# Altium PCB a4403-ELE_PCB.PcbDoc (part 3 of 5)
Units mm, origin at the board's own origin, x right, y up, seen from the top; angles counter-clockwise.
Board outline 160 x 110 mm, 4 copper layers (Top Layer, Int1 (GND), Int2 (PWR), Bottom Layer), stack 1.369 mm thick; 389 components, 298 nets, 1653 pads, 661 vias.
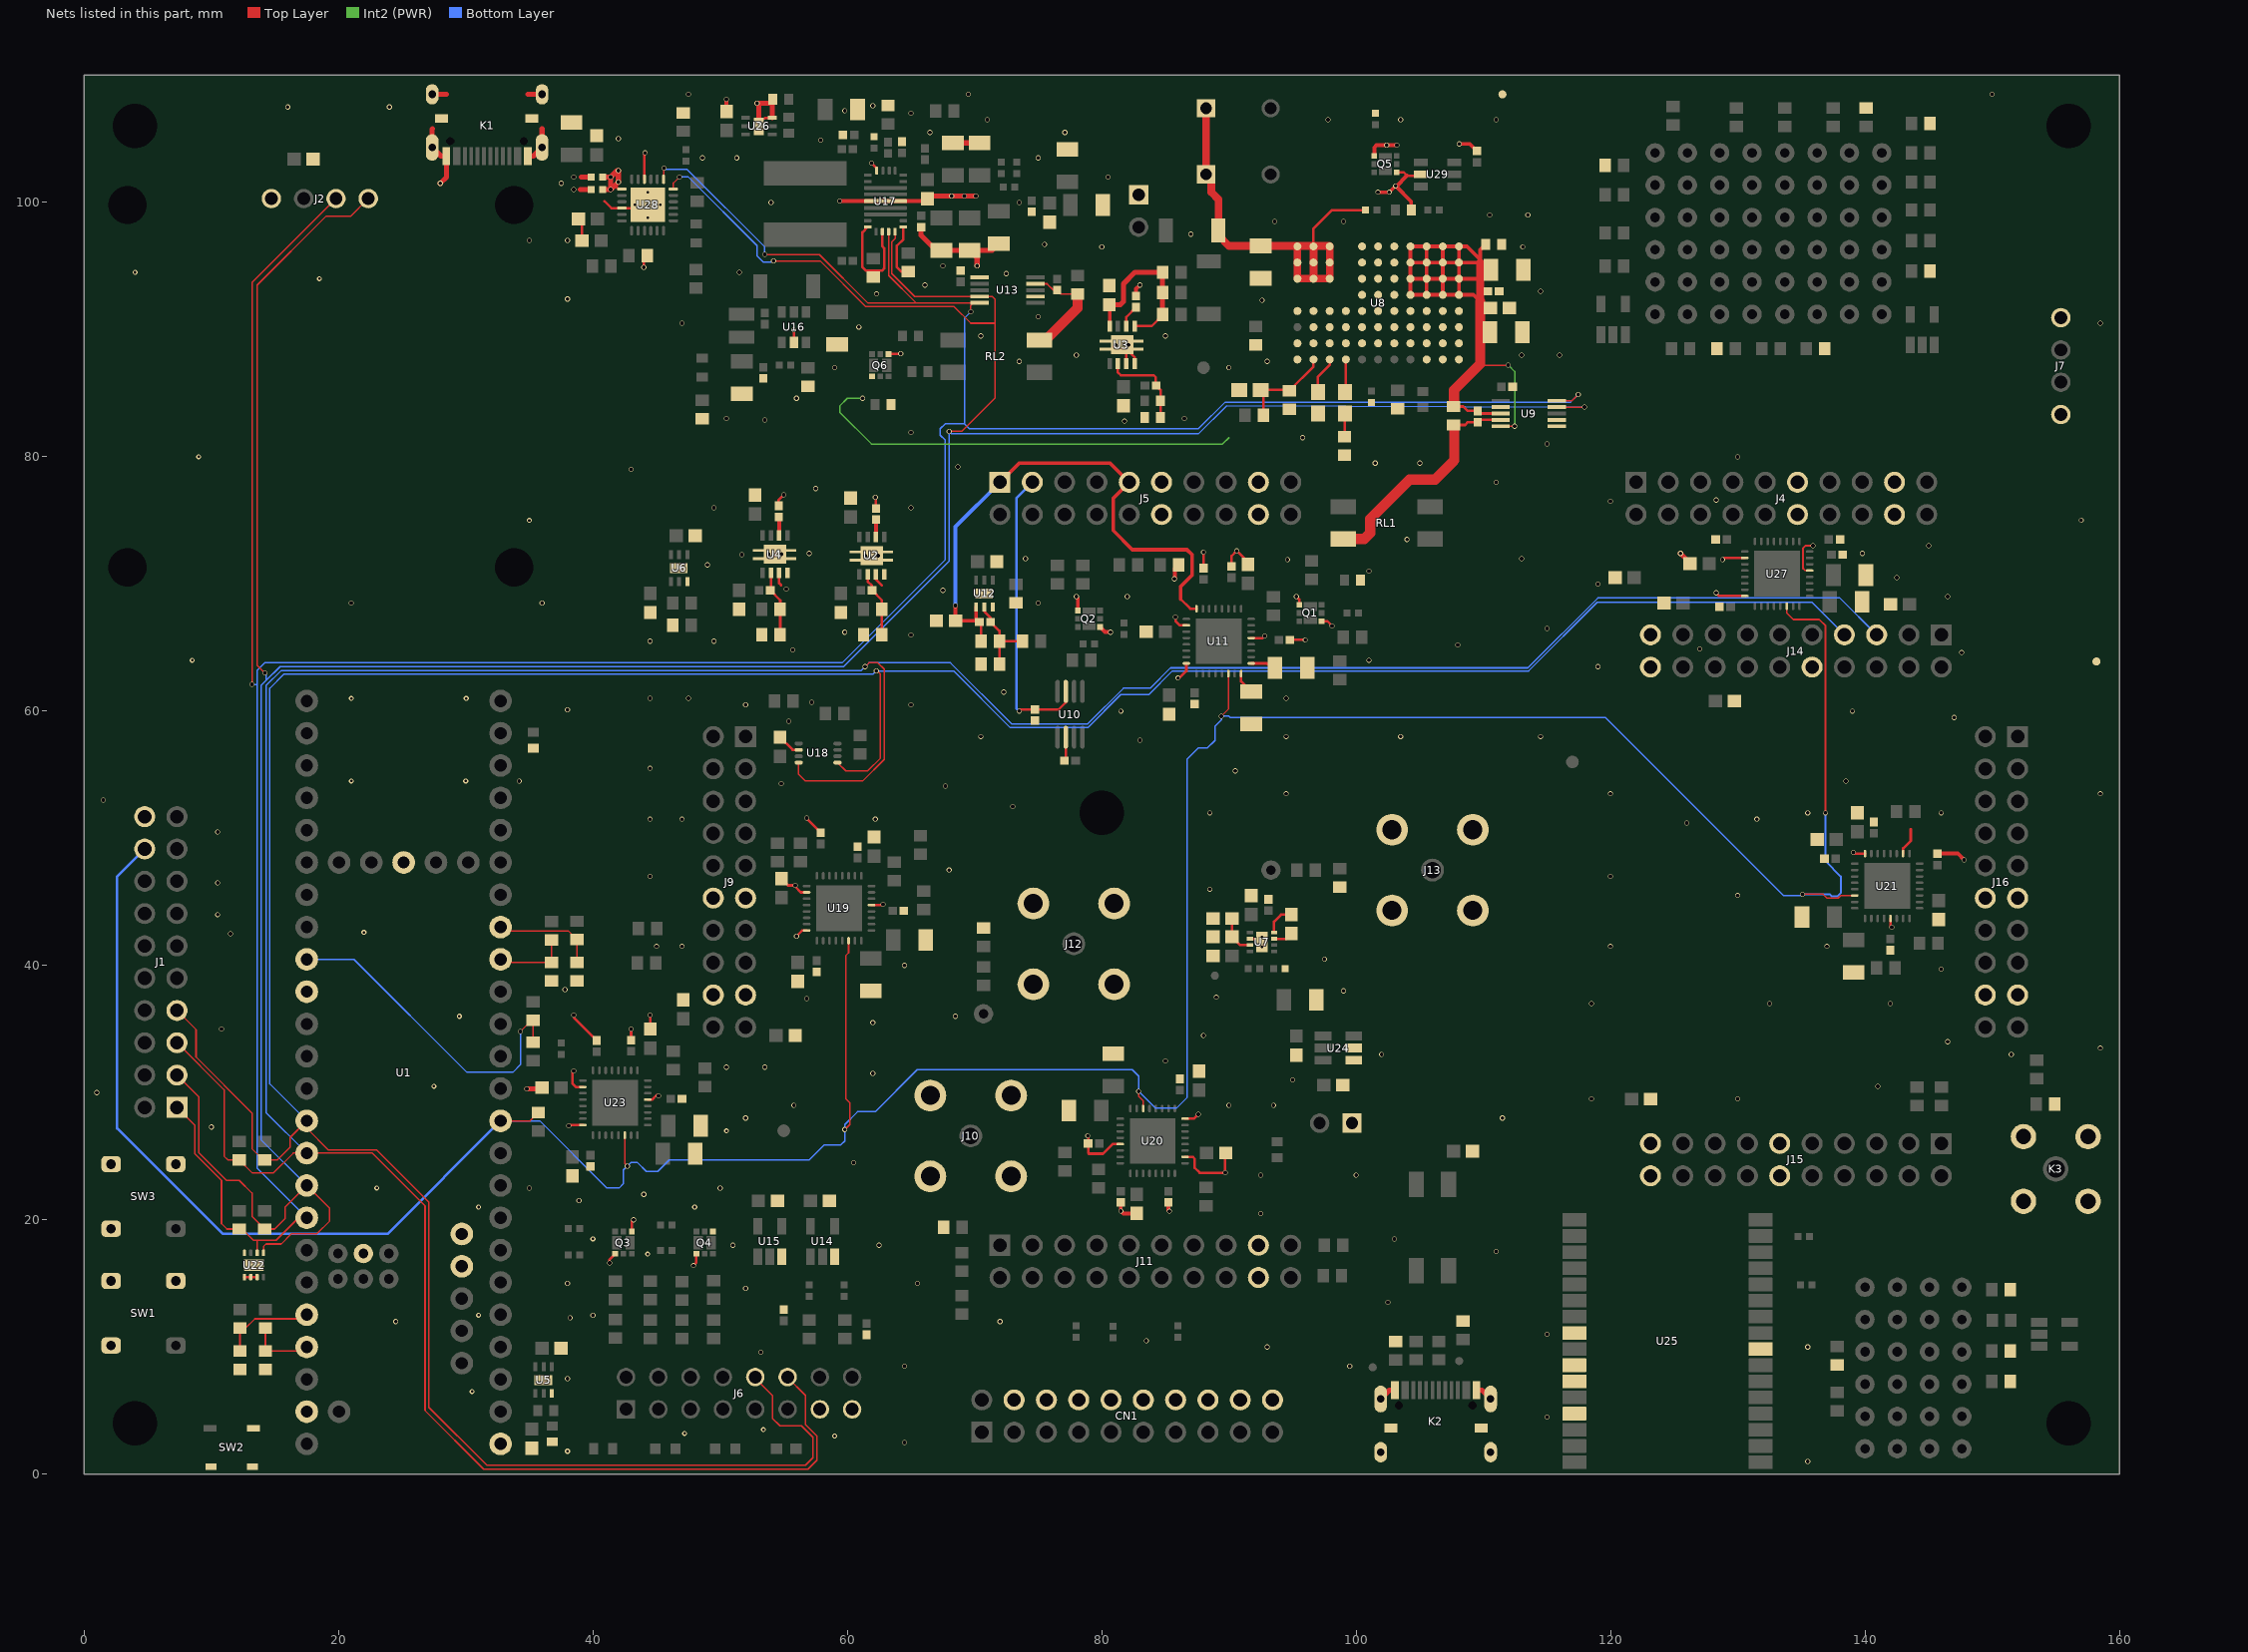
[diagram p4: the nets of this part, all layers, seen from the top]

## Via types
v1: diameter 0.4, hole 0.3, Top Layer to Bottom Layer, tented both sides, 576 vias
v2: diameter 0.5, hole 0.2, Top Layer to Bottom Layer, tented both sides, 59 vias
v3: diameter 0.4, hole 0.2, Top Layer to Bottom Layer, tented both sides, 24 vias
v4: diameter 0.5, hole 0.2, Top Layer to Bottom Layer, 2 vias

## Nets (pads, with @x,y where several pads share a name; then routed paths per layer and width w, separated by ;. In a path a pad name is that pad's centre, name@x,y a point inside that pad or via, vN(x,y) a via of type N, cw(c..) or ccw(c..) an arc to the next point about the centre after c; other vN are vias at no path point) (continued)
GNDU: (continued)
  other v2: 44.3,98.8 44.3,99.8 45.3,99.8 44.3,100.8
I2C1_CLK: J1.1 J2.3 R1.1 U1.40 U9.5 U13.5 U17.3 U22.2 U28.13 | length 274
  Top Layer w0.12: J1.1@7.3,28.84 8.7,27.44 8.7,25.2 10.8,23.1 10.8,19.7 11.225,19.275 R1.1@12.2,19.275 12.425,19.275 13.3,18.4 13.6,18.4 ; v1(13.2,62.1) 13.2,93.7 J2.3@19.8,100.3 ; U22.2@13.6,17.4 13.6,18.4 ; U1.40@17.5,20.16 16.86,20.16 15.1,18.4 13.6,18.4 ; U28.13@45.55,101.825 45.55,102.65 v1(45.6,102.7) ; v1(53.5,95.9) 57.8,95.9 61.6,92.1 65.4,92.1 ; U17.3@63.25,97.7 63.25,94.25 65.4,92.1 ; v1(69.7,91.4) 69.7,91.9 U13.5@69.9,92.1 ; U13.5@70.4,92.1 U13.5@69.9,92.1 ; U9.5@115.76,84.4 116.96,84.4 v1(117.46,84.9) ; 65.4,92.1 U13.5@69.9,92.1
  Bottom Layer w0.12: v1(13.2,62.1) 13.6,62.1 ; U1.40@17.5,20.16 13.6,24.06 13.6,62.1 ; v1(45.6,102.7) 45.7,102.6 47.4,102.6 53.5,96.5 v1(53.5,95.9) ; v1(69.7,91.4) 69.2,90.9 69.2,82.6 ; v1(117.46,84.9) 116.86,84.3 89.7,84.3 87.6,82.2 69.6,82.2 69.2,82.6 ; 13.6,62.1 13.6,63.2 14.2,63.8 59.6,63.8 67.7,71.9 67.7,81.3 67.3,81.7 67.3,82.2 67.7,82.6 69.2,82.6
I2C1_SDA: J1.3 J2.4 R2.1 U1.39 U9.4 U13.4 U17.4 U22.1 U28.12 | length 292.2
  Top Layer w0.12: J1.3@7.3,31.38 9,29.68 9,25.3 11.2,23.1 12.2,23.1 13.2,22.1 13.2,20.275 R2.1@14.2,19.275 14.975,19.275 15.8,20.1 15.8,21 U1.39@17.5,22.7 19.3,20.9 19.3,19.9 18.3,18.9 16.3,18.9 15.5,18.1 14.3,18.1 14.1,17.9 U22.1@14.1,17.4 ; v1(14.2,63) 13.6,63.6 13.6,93.5 19,98.9 20.94,98.9 J2.4@22.34,100.3 ; U28.12@46.325,101.05 46.325,101.525 v1(46.8,102) ; v1(54.2,95.4) 57.86,95.4 61.46,91.8 68.4,91.8 69.7,90.5 71.6,90.5 ; U17.4@63.75,97.7 63.75,97.15 63.5,96.9 63.5,94.4 65.3,92.6 U13.4@70.4,92.6 71.4,92.6 71.6,92.4 71.6,90.5 ; v1(68,82) 69,82 71.6,84.6 71.6,90.5 ; U9.4@115.76,83.9 v1(117.96,83.9)
  Bottom Layer w0.12: v1(14.2,63) 14.3,62.9 14.3,62.4 ; U1.39@17.5,22.7 13.9,26.3 13.9,62 14.3,62.4 ; v1(46.8,102) 47.5,102 52.9,96.6 52.9,95.8 53.4,95.3 54.024,95.3 54.124,95.4 v1(54.2,95.4) ; v1(117.96,83.9) 89.8,84 87.6,81.8 68.2,81.8 v1(68,82) 68,71.8 59.7,63.5 15.4,63.5 14.3,62.4
I2C2_SCL: J1.7 J6.10 J14.7 R5.1 U1.37 U18.5 | length 268.2
  Top Layer w0.12: J1.7@7.3,36.46 8.8,34.96 8.8,32.8 13.2,28.4 13.2,25.6 14.1,24.7 R5.1@14.2,24.7 15.2,24.7 16.2,25.7 16.2,26.48 U1.37@17.5,27.78 17.5,27.2 19.2,25.5 23,25.5 27.1,21.4 27.1,5.257 31.657,0.7 56.7,0.7 57.3,1.3 57.3,2.9 56.4,3.8 54.7,3.8 54.1,4.4 54.1,6.2 J6.10@52.275,8.025 ; U18.5@59.225,55.95 59.875,55.3 61.6,55.3 62.6,56.3 62.6,62.9 62.347,63.153 v1(62.272,63.153)
  Bottom Layer w0.12: U1.37@17.5,27.78 14.6,30.68 14.6,61.8 15.7,62.9 62.019,62.9 v1(62.272,63.153) 68.347,63.153 72.8,58.7 78.9,58.7 81.5,61.3 83.7,61.3 85.561,63.161 113.558,63.161 118.947,68.55 135.83,68.55 J14.7@138.38,66
I2C2_SDA: J1.5 J6.12 J14.5 R4.1 U1.38 U18.4 | length 276
  Top Layer w0.12: J1.5@7.3,33.92 11,30.22 11,25 11.3,24.7 R4.1@12.2,24.7 13.2,23.7 14.9,23.7 16.44,25.24 U1.38@17.5,25.24 22.66,25.24 26.8,21.1 26.8,5.003 31.403,0.4 56.9,0.4 57.6,1.1 57.6,3 56.7,3.9 56.7,6.2 J6.12@55.28,7.62 ; U18.4@56.175,55.95 56.175,55.025 56.7,54.5 61.2,54.5 62.9,56.2 62.9,63.3 62.4,63.8 61.7,63.8 v1(61.4,63.5)
  Bottom Layer w0.12: U1.38@17.5,25.24 14.3,28.44 14.3,62 15.5,63.2 61.1,63.2 v1(61.4,63.5) 61.7,63.8 68.1,63.8 72.9,59 78.9,59 81.7,61.8 83.8,61.8 85.4,63.4 113.5,63.4 119,68.9 138.02,68.9 J14.5@140.92,66
LTM_IN: C24.2 D8.1 R72.1 R74.1 R82.1 U8.J1 U8.J2 U8.J3 U8.K1 U8.K2 U8.K3 U8.L1 U8.L2 U8.L3 | length 35.8
  Top Layer w0.2: U8.K1@96.65,96.54 96.65,96.575 96.65,97.95 98.1,99.4 R82.1@100.75,99.4
  Top Layer w0.6: R74.1@88.2,107.4 R72.1@88.2,102.2 88.615,101.784 88.615,100.784 89.175,100.225 D8.1@89.175,97.8 89.175,97.41 90.01,96.575 C24.2@92.5,96.575 96.65,96.575 97.877,96.575 97.912,96.54 U8.J1@97.92,96.54 U8.J2@97.92,95.27 U8.J3@97.92,94 U8.K3@96.65,94 ; U8.L1@95.38,96.54 U8.L2@95.38,95.27 U8.L3@95.38,94 U8.K3@96.65,94 ; U8.K1@96.65,96.54 U8.K2@96.65,95.27 U8.K3@96.65,94
NetC2_2: C2.2 C17.2 U7.3 | length 3.1
  Top Layer w0.2: C2.2@90.25,43.7 C17.2@90.25,42.25 90.9,41.6 U7.3@91.65,41.6
NetC3_1: C3.1 R15.1 R18.2 U2.2 | length 5.2
  Top Layer w0.2: U2.2@61.6,70.75 61.6,70.2 61.94,69.86 C3.1@61.94,69.5 62.725,68.715 R15.1@62.725,68 R18.2@62.725,66
NetC4_1: C4.1 R16.1 R19.2 U3.2 | length 7.2
  Top Layer w0.2: U3.2@81.275,87.325 81.275,86.625 81.5,86.4 84.1,86.4 84.24,86.26 C4.1@84.24,85.8 ; C4.1@84.28,85.6 84.625,85.255 R16.1@84.625,84.4 R19.2@84.625,82.8
NetC5_1: C5.1 R17.1 R20.2 U4.2 | length 5.2
  Top Layer w0.2: U4.2@53.994,70.865 53.994,69.554 C5.1@53.94,69.5 54.725,68.715 R17.1@54.725,68 R20.2@54.725,66
NetC10_2: C10.2 R86.1 R133.1 R134.1 U3.5 U3.8 | length 13.7
  Top Layer w0.2: U3.5@82.575,90.275 83.925,90.275 84.775,91.125 R86.1@84.775,91.2
  Top Layer w0.3: C10.2@80.6,91.95 80.625,91.925 U3.8@80.625,90.275
  Top Layer w0.4: C10.2@80.6,91.95 80.616,91.966 81.466,91.966 81.7,92.2 81.7,93.6 82.6,94.5 R134.1@84.775,94.5 R133.1@84.775,92.9 R86.1@84.775,91.2
NetC12_2: C12.2 U2.6 | length 1.4
  Top Layer w0.3: U2.6@62.25,73.7 C12.2@62.25,75.06
NetC13_2: C13.2 U3.6 | length 1.8
  Top Layer w0.2: U3.6@81.925,90.275 81.925,90.985 C13.2@82.7,91.76
NetC14_2: C14.2 U4.6 | length 1.5
  Top Layer w0.3: C14.2@54.6,75.26 54.644,75.216 U4.6@54.644,73.815
NetC23_1: C23.1 U7.7 | length 1.5
  Top Layer w0.2: U7.7@93.55,42.1 94.5,42.1 C23.1@94.9,42.5
NetC23_2: C23.2 U7.8 | length 2.4
  Top Layer w0.2: U7.8@93.55,42.6 93.55,43.45 94.1,44 C23.2@94.9,44
NetC25_2: C25.2 C26.2 C27.2 C30.2 C32.2 R27.1 R88.2 U8.A1 U8.A2 U8.A3 U8.A4 U8.B1 U8.B2 U8.B3 U8.B4 U8.C1 U8.C2 U8.C3 U8.C4 U8.D1 U8.D2 U8.D3 U8.D4 U9.8 U9.10 | length 67.3
  Top Layer w0.12: 109.75,87.3 109.85,87.2 v1(111.96,87.2) ; U9.10@111.36,82.4 v1(112.46,82.4)
  Top Layer w0.2: R27.1@107.66,83.95 108.41,83.95 108.76,83.6 C32.2@109.56,83.6 109.76,83.4 U9.8@111.36,83.4
  Top Layer w0.3: R27.1@107.66,83.95 R27.1@107.7,83.99 ; 109.75,89.8 C30.2@110.525,89.8 ; 109.75,91.7 C26.2@110.55,91.7 ; 109.75,92.2 109.22,92.73 U8.A4@108.08,92.73 ; 109.75,93.1 110.26,93.1 C25.2@110.36,93 ; 109.75,94 U8.A3@108.08,94 ; C27.2@110.03,95.22 109.75,95.5 ; C27.2@110.03,95.27 C27.2@110.6,94.7 ; R88.2@110.175,96.7 109.75,96.275 109.75,95.5 ; U8.D3@104.27,94 U8.C3@105.54,94 ; U8.D3@104.27,94 U8.D2@104.27,95.27 ; U8.D3@104.27,94 U8.D4@104.27,92.73 U8.C4@105.54,92.73 ; U8.D2@104.27,95.27 U8.C2@105.54,95.27 ; U8.D2@104.27,95.27 U8.D1@104.27,96.54 U8.C1@105.54,96.54 ; U8.C4@105.54,92.73 U8.C3@105.54,94 ; U8.C4@105.54,92.73 U8.B4@106.81,92.73 ; U8.C3@105.54,94 U8.B3@106.81,94 ; U8.C3@105.54,94 U8.C2@105.54,95.27 ; U8.C2@105.54,95.27 U8.B2@106.81,95.27 ; U8.C2@105.54,95.27 U8.C1@105.54,96.54 ; U8.C1@105.54,96.54 U8.B1@106.81,96.54 ; U8.B4@106.81,92.73 U8.B3@106.81,94 ; U8.B4@106.81,92.73 U8.A4@108.08,92.73 ; U8.B3@106.81,94 U8.A3@108.08,94 ; U8.B3@106.81,94 U8.B2@106.81,95.27 ; U8.B2@106.81,95.27 U8.A2@108.08,95.27 ; U8.B2@106.81,95.27 U8.B1@106.81,96.54 ; U8.B1@106.81,96.54 U8.A1@108.08,96.54 ; U8.A4@108.08,92.73 U8.A3@108.08,94 ; U8.A3@108.08,94 U8.A2@108.08,95.27 ; U8.A2@108.08,95.27 109.75,95.27 109.75,95.5 ; U8.A2@108.08,95.27 U8.A1@108.08,96.54 ; U8.A1@108.08,96.54 108.71,96.54 109.75,95.5
  Top Layer w0.6: 109.75,92.2 109.75,93.1 109.75,94 109.75,95.27
  Top Layer w0.8: R27.1@107.7,83.99 107.7,85.25 109.75,87.3 109.75,89.8 109.75,91.7 109.75,92.2
  Int2 (PWR) w0.12: v1(111.96,87.2) 112.46,86.7 v1(112.46,82.4)
NetC28_1: C28.1 R31.1 | length 1.8
  Top Layer w0.2: R31.1@99.085,81.566 99.106,81.588 C28.1@99.106,83.398
NetC28_2: C28.2 U8.H8 | length 2.6
  Top Layer w0.2: C28.2@99.106,85.098 99.19,85.182 U8.H8@99.19,87.65
NetC29_2: C29.2 U8.J8 | length 2.9
  Top Layer w0.2: C29.2@97,85.1 97,86.3 97.92,87.22 U8.J8@97.92,87.65
NetC31_2: C31.2 R34.2 R36.1 U8.K8 | length 7.6
  Top Layer w0.2: R36.1@92.725,83.25 92.725,85.025 C31.2@92.5,85.25 94.7,85.25 R34.2@94.75,85.2 96.65,87.1 U8.K8@96.65,87.65
NetC32_1: C32.1 R27.2 RL1.4 U9.9 | length 18.6
  Top Layer w0.2: R27.2@107.66,82.5 108.56,82.5 108.78,82.72 C32.1@109.56,82.72 109.74,82.9 U9.9@111.36,82.9
  Top Layer w0.3: R27.2@107.66,82.5 R27.2@107.704,82.456
  Top Layer w0.8: RL1.4@99,73.53 100.63,73.53 101.1,74 101.1,75.1 104.2,78.2 106.2,78.2 107.704,79.704 R27.2@107.704,82.456
NetC35_1: C35.1 J5.3 U10.7 | length 23.4
  Top Layer w0.2: v1(73.5,60) 73.63,60.13 C35.1@74.75,60.13 76.63,60.13 77.175,60.675 U10.7@77.175,61.55
  Bottom Layer w0.2: v1(73.5,60) 73.3,60.2 73.3,76.76 J5.3@74.54,78
NetC36_2: C36.2 U11.8 | length 1.8
  Top Layer w0.2: U11.8@90.95,62.95 90.95,62.325 C36.2@91.75,61.525
NetC38_2: C38.2 U11.9 | length 1.6
  Top Layer w0.2: U11.9@91.75,63.75 92.975,63.75 C38.2@93.225,63.5
NetC45_2: C45.2 C46.2 J5.1 J5.9 R46.2 U11.24 U12.1 | length 45.1
  Top Layer w0.2: C46.2@70.37,67 70.5,66.87 R46.2@70.5,65.5 ; 86.2,68.8 86.95,68.05 U11.24@87.45,68.05
  Top Layer w0.3: v1(68.5,68.3) C45.2@68.5,67.1 C46.2@70.27,67.1 ; U12.1@70.125,68.2 70.125,67.245 C46.2@70.27,67.1 ; C46.2@70.37,67 C46.2@70.27,67.1 ; J5.1@72,78 73.5,79.5 80.66,79.5 J5.9@82.16,78 80.9,76.74 80.9,74.2 82.4,72.7 86.7,72.7 87.1,72.3 87.1,70.7 86.2,69.8 86.2,68.8
  Bottom Layer w0.3: v1(68.5,68.3) 68.5,74.5 J5.1@72,78
NetC46_1: C46.1 R46.1 R47.1 R49.2 U12.2 | length 6.8
  Top Layer w0.2: U12.2@70.775,68.2 70.775,67.825 71.25,67.35 C46.1@71.25,67 71.95,66.3 R46.1@71.95,65.5 ; R49.2@71.95,63.7 R46.1@71.95,65.5 ; R47.1@73.75,65.5 R46.1@71.95,65.5
NetC48_1: C48.1 R50.2 RL2.4 U13.9 | length 8.8
  Top Layer w0.14: U13.9@74.8,93.6 75.7,93.6 76.2,93.1 C48.1@76.5,93.1 76.8,92.8 R50.2@78.1,92.8
  Top Layer w0.4: RL2.4@75.1,89.17 RL2.4@75.57,89.17
  Top Layer w0.8: RL2.4@75.57,89.17 78.1,91.7 R50.2@78.1,92.8